# Altium PCB PCB1.PcbDoc (part 2 of 4)
Units mil, origin at the board's own origin, x right, y up, seen from the top; angles counter-clockwise.
Board outline 1649.96 x 1854.5 mil, 6 copper layers (Top Layer, Layer 2, Layer 3, Layer 4, Layer 5, Bottom Layer), stack 32.112 mil thick; 86 components, 196 nets, 681 pads, 452 vias.
Unrouted connection lines stored in the file: 66.
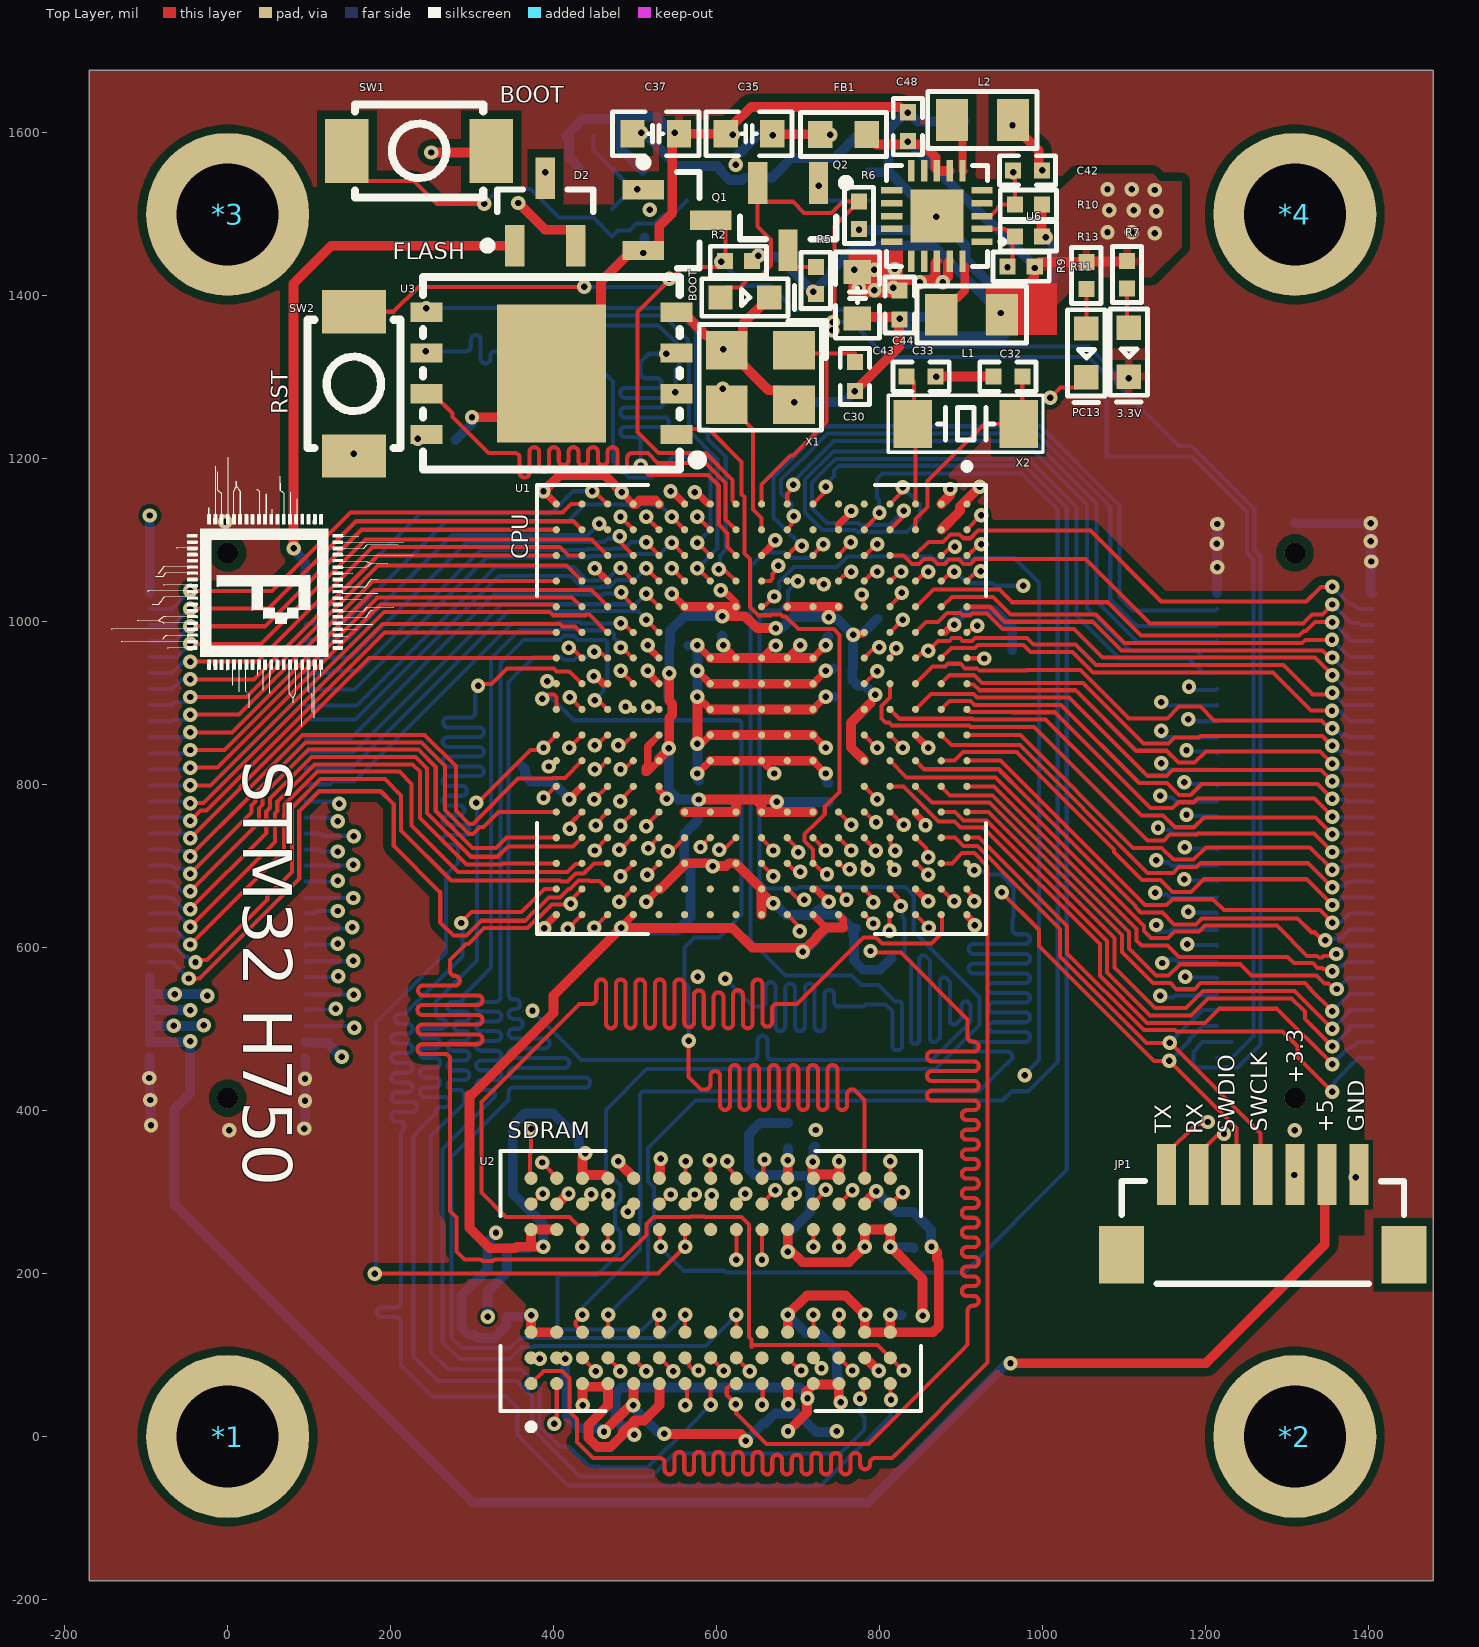
[diagram p0: Top Layer view]

## Via types
v1: diameter 17.7, hole 7.9, Top Layer to Bottom Layer, tented both sides, 452 vias

## Nets (pads, with @x,y where several pads share a name; then routed paths per layer and width w, separated by ;. In a path a pad name is that pad's centre, name@x,y a point inside that pad or via, vN(x,y) a via of type N, cw(c..) or ccw(c..) an arc to the next point about the centre after c; other vN are vias at no path point) (continued)
"FMC_D4 / PE7": (continued)
  Top Layer w5: v1(386.26,905.72) 389.24,905.72 394.04,910.53 400.58,910.53 403.51,907.6 U1.U9@403.51,892.5 ; v1@565.95,485.95 565.95,441.05 571.05,435.95 581,426 586.5,426 ccw(c586.5,432) 592.5,432 592.5,442.6 cw(c598.5,442.6) 604.5,442.6 604.5,406.8 ccw(c610.5,406.8) 616.5,406.8 616.5,450 cw(c622.5,450) 628.5,450 628.5,406.8 ccw(c634.5,406.8) 640.5,406.8 640.5,450 cw(c646.5,450) 652.5,450 652.5,406.8 ccw(c658.5,406.8) 664.5,406.8 664.5,450 cw(c670.5,450) 676.5,450 676.5,406.8 ccw(c682.5,406.8) 688.5,406.8 688.5,450 cw(c694.5,450) 700.5,450 700.5,406.8 ccw(c706.5,406.8) 712.5,406.8 712.5,450 cw(c718.5,450) 724.5,450 724.5,406.8 ccw(c730.5,406.8) 736.5,406.8 736.5,450 cw(c742.5,450) 748.5,450 748.5,406.8 ccw(c754.5,406.8) 760.5,406.8 760.5,420 cw(c766.5,420) 766.5,426 769,426 781.95,413.05 U2.P9@781.95,317.01
  Bottom Layer w5: v1(386.26,905.72) 398.46,905.72 425.04,879.13 628.02,879.13 630.95,876.2 630.95,640.72 602.95,612.72 572.95,612.72 560.65,600.42 560.65,557.32 565.95,552.02 v1@565.95,486.05
  other v1: 566,486